# Altium PCB GNSS_PCB.PcbDoc
Units mm, origin at the board's own origin, x right, y up, seen from the top; angles counter-clockwise.
Board outline 80.13 x 49.05 mm, 2 copper layers (Top Layer, Bottom Layer), stack 1.571 mm thick; 81 components, 50 nets, 309 pads, 125 vias.
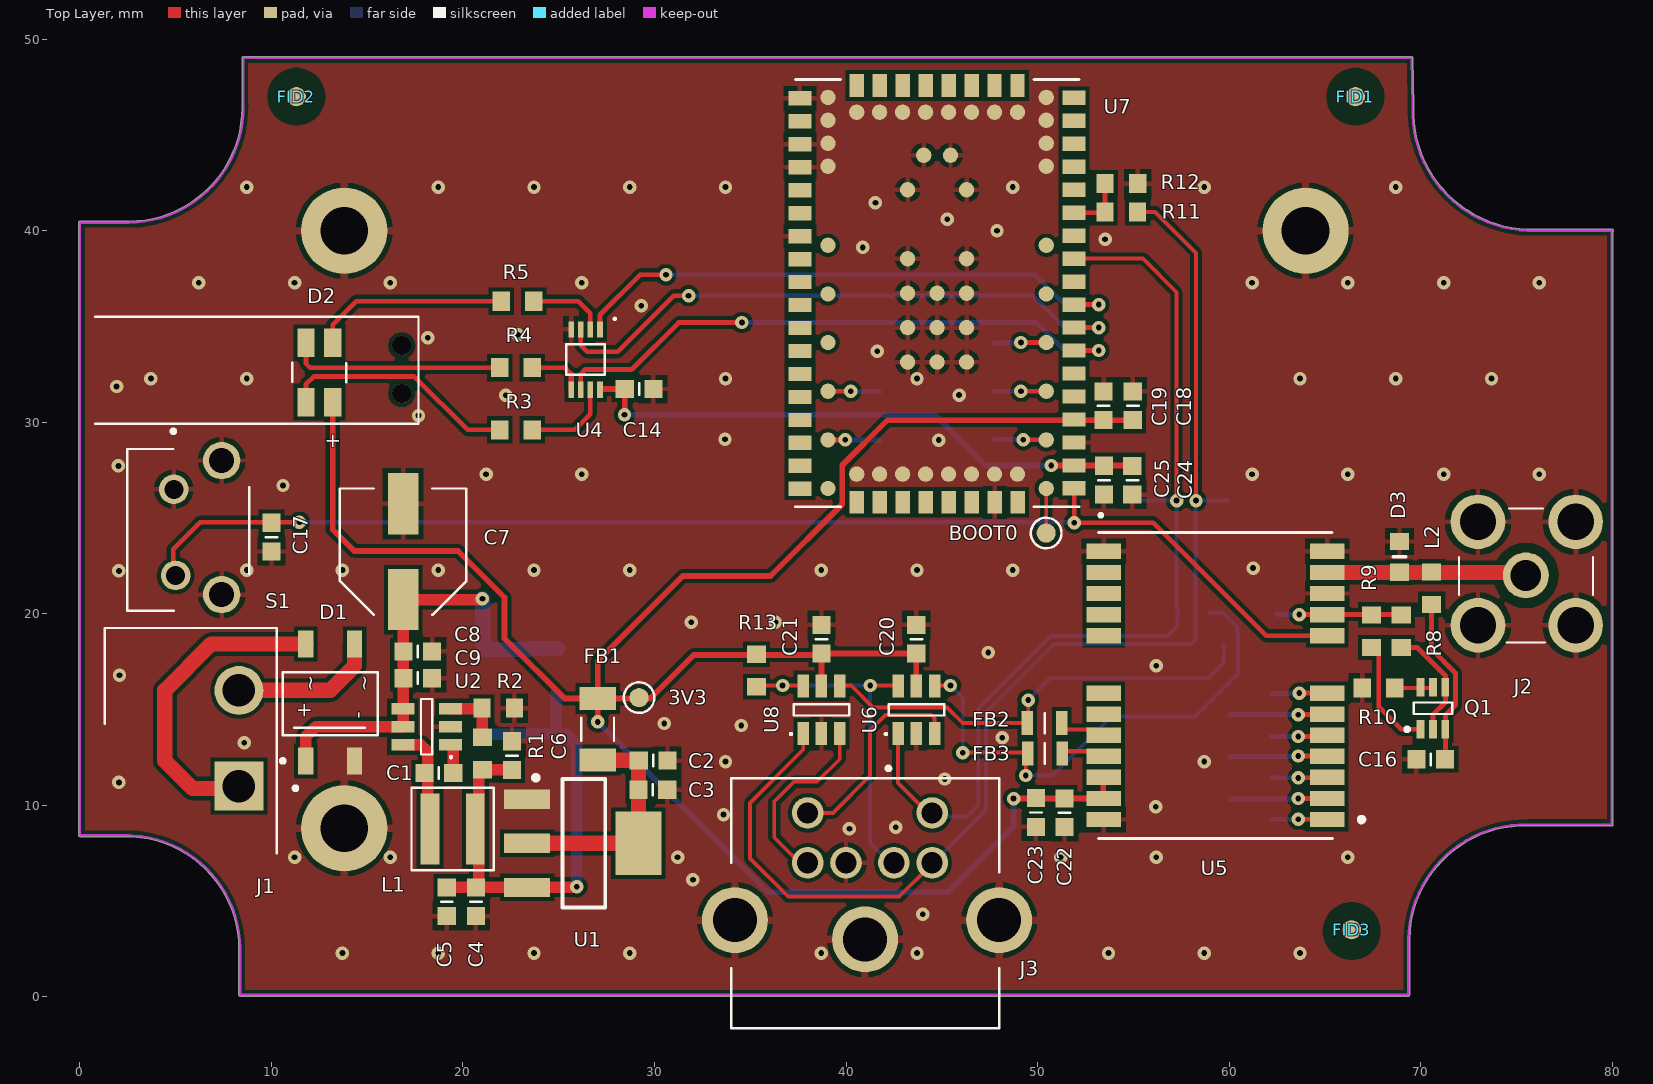
[diagram p0: Top Layer view]
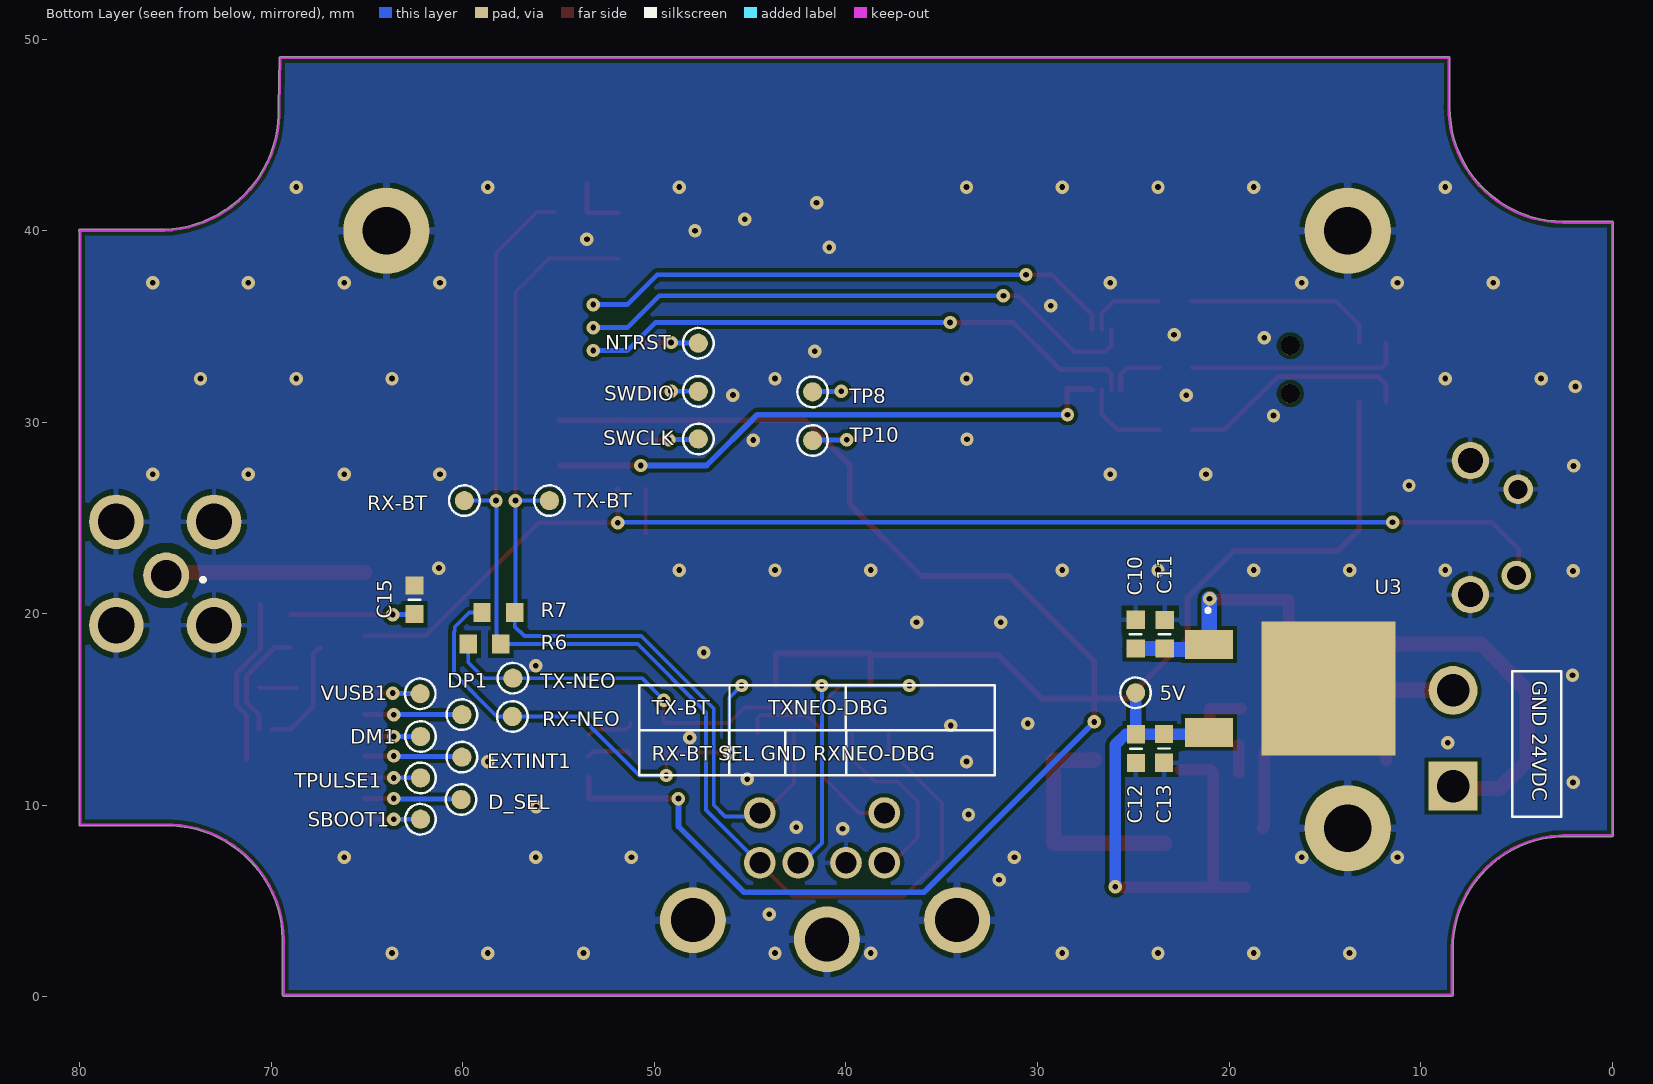
[diagram p1: Bottom Layer view, seen from below]
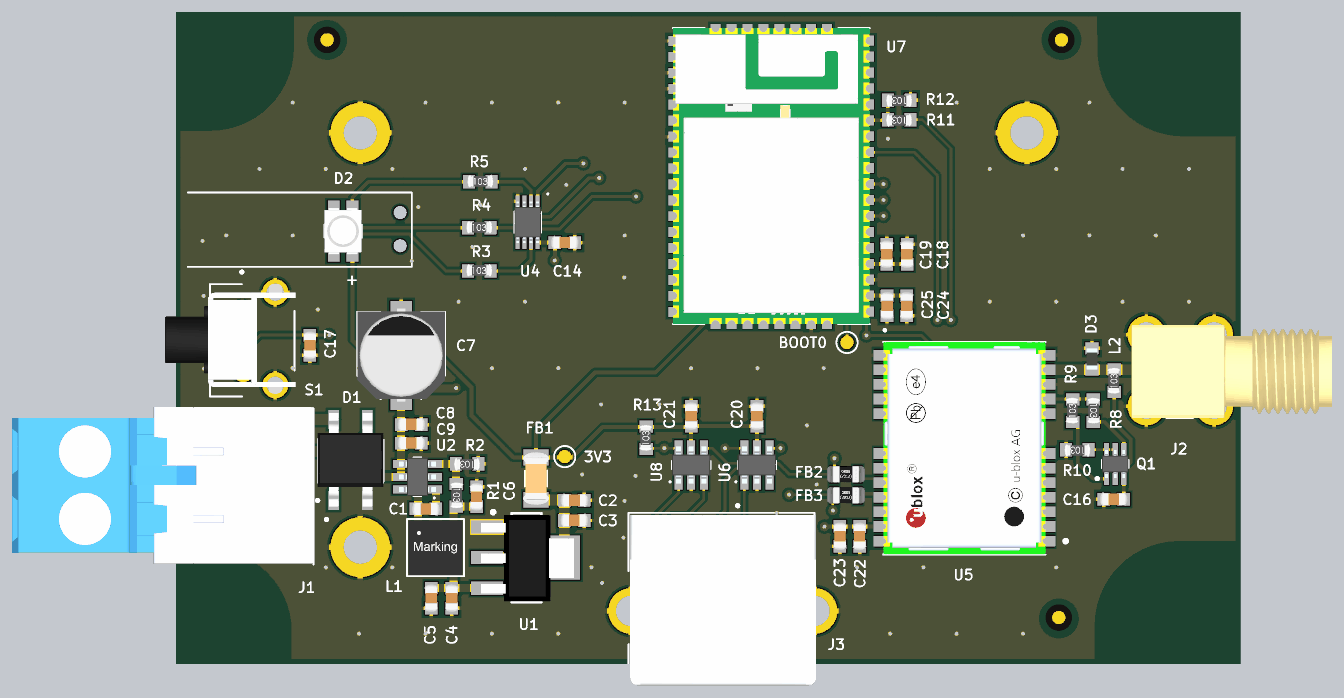
[diagram p2: 3D render of the assembled board from above, using the file's embedded part models]
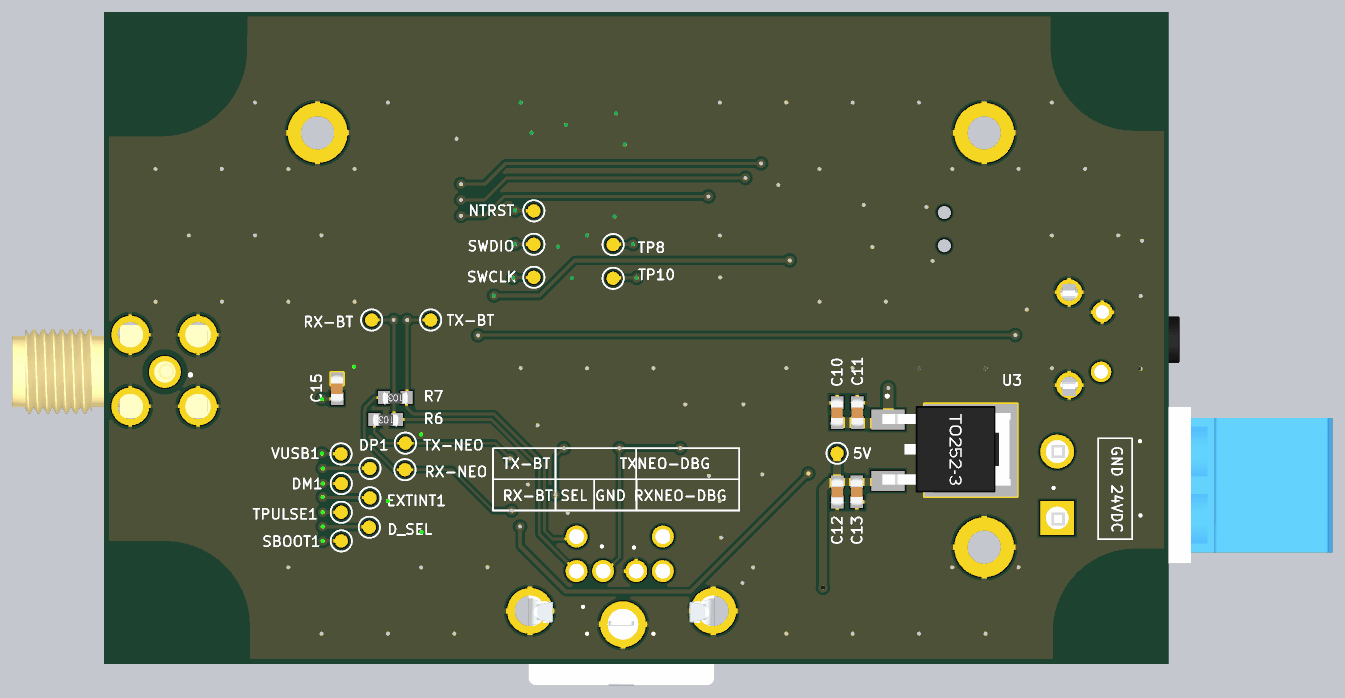
[diagram p3: 3D render of the assembled board from below, using the file's embedded part models]

## Layer stack, top to bottom
Top Solder: solder mask 0.0102, Solder Resist, Dk 3.5
Top Layer: signal copper 0.0356
Dielectric 1: dielectric 1.5, FR-4, Dk 4.8
Bottom Layer: signal copper 0.0356
Bottom Solder: solder mask 0.0102, Solder Resist, Dk 3.5

## Board outline
0,8.366 2.338,8.366 ccw(c2.343,8.43) 2.344,8.366 cw(c2.398,2.461) 8.303,2.515 ccw(c8.367,2.516) 8.303,2.51 8.303,0.1 ccw(c8.367,0.1) 8.367,0.036 69.367,0.036 ccw(c69.367,0.1) 69.431,0.1 69.431,2.999 cw(c75.47,2.892) 75.577,8.931 ccw(c75.578,8.995) 75.578,8.931 79.986,8.931 ccw(c79.986,8.995) 80.05,8.995 80.05,39.967 ccw(c80,40.007) 80.064,40.007 ccw(c80,40.007) 80,40.071 75.593,40.071 ccw(c75.821,46.243) 75.594,40.071 75.593,40.071 cw(c75.821,46.243) 69.648,46.47 ccw(c69.584,46.472) 69.648,46.472 ccw(c69.584,46.472) 69.648,46.474 69.595,49.023 cw(c69.531,49.022) 69.595,49.022 69.595,49.023 ccw(c69.531,49.022) 69.531,49.086 8.531,49.086 ccw(c8.531,49.022) 8.467,49.022 8.467,46.472 ccw(c8.531,46.472) 8.467,46.472 cw(c2.52,46.441) 8.468,46.441 cw(c2.52,46.441) 2.551,40.493 cw(c2.52,46.441) 2.551,40.493 0.012,40.493 ccw(c0,40.43) -0.064,40.43 -0.064,8.43 ccw(c0,8.43)

## Design rules (kind name [scope] priority, off if disabled: settings)
BoardOutlineClearance [NOT(IsTrack AND OnLayer('Top Overlay'))] p1: gap=0.254 ignorepadtopadclearanceinfootprint=FALSE
Clearance Clearance_2 [(InComponent('J2') AND InNet('NetD3_2') AND IsPad)] p1: gap=0.5 ignorepadtopadclearanceinfootprint=FALSE
Clearance [All] p2: gap=0.2 ignorepadtopadclearanceinfootprint=FALSE
HoleSize [All] p1: absolutevalues=TRUE maxlimit=10 minlimit=0.3 maxpercent=80.000 minpercent=20.000
MinimumSolderMaskSliver [All] p1: minsoldermaskwidth=0.09
PolygonConnect [All] p1: thpad.connectstyle=Relief thpad.reliefconductorwidth=0.254 thpad.reliefentries=4 thpad.polygonreliefangle="90 Angle" thpad.airgapwidth=0.3 smdpad.connectstyle=Direct smdpad.reliefconductorwidth=0.254 smdpad.reliefentries=4 smdpad.polygonreliefangle="90 Angle" smdpad.airgapwidth=0.254 via.connectstyle=Direct via.reliefconductorwidth=0.254 via.reliefentries=4 via.polygonreliefangle="90 Angle" via.airgapwidth=0.254
RoutingVias [All] p1: holewidth=0.3 width=0.7 viastyle="Through Hole" minholewidth=0.3 minwidth=0.7 maxholewidth=0.711 maxwidth=1.27
SilkToSolderMaskClearance [IsPad] p1: minsilkscreentomaskgap=0.2 clearancetoexposedcopper=TRUE
SolderMaskExpansion [All] p1: expansion=0.102 istentingtop=FALSE
Width [All] p1: maxlimit=2 minlimit=0.2 preferedwidth=0.254
27 further rules are at their usual default settings.

## Components (designator, comment, footprint, x,y, rotation, side; value= is the part's Value field where it differs from the comment)
3V3 "Test Point" TP 29.195,15.621 r90 top
5V "Test Point" TP 24.877,15.875 r180 bottom
BOOT0 "Test Point" TP 50.452,24.215 r90 top
C1 "C0603C104K5RAC3121" CAPC1608N 18.741,11.688 r0 top
C2 "C0603C104K5RAC3121" CAPC1608N 29.926,12.334 r0 top
C3 "GRM188R6YA106MA73D" CAPC1608N 29.914,10.81 r180 top
C4 "GRM188R6YA106MA73D" CAPC1608N 20.676,4.963 r90 top
C5 "C0603C104K5RAC3121" CAPC1608N 19.152,4.963 r270 top
C6 "GRM188R61A226ME15D" CAPC1608N 22.558,12.595 r270 top
C7 "EEEFK1V101XP" ECAP_SMD_6.3 16.876,23.241 r90 top
C8 "GRM188R6YA475KE5D" CAPC1608N 17.638,18.034 r180 top
C9 "C0603C104K5RAC3121" CAPC1608N 17.638,16.637 r180 top
C10 "GRM188R6YA106MA73D" CAPC1608N 24.872,18.935 r270 bottom
C11 "C0603C104K5RAC3121" CAPC1608N 23.359,18.929 r90 bottom
C12 "C0603C104K5RAC3121" CAPC1608N 24.861,12.957 r90 bottom
C13 "GRM188R6YA106MA73D" CAPC1608N 23.391,12.966 r270 bottom
C14 "C0603C104K5RAC3121" CAPC1608N 29.194,31.734 r180 top
C15 "GRT188R61H105KE13D" CAPC1608N 62.531,20.733 r270 bottom
C16 "C0603C104K5RAC3121" CAPC1608N 70.532,12.401 r180 top
C17 "C0603C104K5RAC3121" CAPC1608N 10,24 r90 top
C18 "C0603C104K5RAC3121" CAPC1608N 54.976,30.861 r270 top locked
C19 "GRT188R61H105KE13D" CAPC1608N 53.452,30.861 r270 top locked
C20 "C0603C104K5RAC3121" CAPC1608N 43.673,18.669 r270 top
C21 "C0603C104K5RAC3121" CAPC1608N 38.72,18.669 r270 top
C22 "C0603C104K5RAC3121" CAPC1608N 51.406,9.61 r270 top
C23 "GRM188R6YA106MA73D" CAPC1608N 49.916,9.623 r90 top
C24 "C0603C104K5RAC3121" CAPC1608N 54.95,26.972 r270 top locked
C25 "GRM188R6YA106MA73D" CAPC1608N 53.465,26.976 r90 top locked
D1 "MB6S" MB6S-2 13.066,15.367 r180 top
D2 "150141M173100" 150141M173100 12.5,32.6 r270 top
D3 "PESD0603-240" TVS1608 68.9,22.973 r270 top
D_SEL "Test Point" TP 60.1,10.3 r90 bottom
DM1 "Test Point" TP 62.215,13.589 r90 bottom
DP1 "Test Point" TP 60.056,14.732 r90 bottom
EXTINT1 "Test Point" TP 60.056,12.515 r90 bottom
FB1 "2512067007Y3" INDC3216N 27.036,13.97 r90 top
FB2 "BLM21BD102SZ1D" FB2012 50.369,14.289 r0 top
FB3 "BLM21BD102SZ1D" FB2012 50.38,12.703 r0 top
FID1 "Fiducial" FIDUCIAL-1MM#1 66.6,47 r0 top
FID2 "Fiducial" FIDUCIAL-1MM#1 11.3,47 r90 top
FID3 "Fiducial" FIDUCIAL-1MM#2 66.406,3.429 r90 top
J1 "TBP01R1-508-02BE" CUI_TBP01R1-508-02BE 8.3,13.4 r90 top locked
J2 "PCB.SMAFRA.HT" PCB.SMAFRA.HT 75.5,22 r180 top
J3 "KMDGX-6S-BS" KMDGX6SBS 42.3,7 r180 top locked
L1 "74438356150" IND4020 19.461,8.767 r0 top
L2 "L0603C27NJRMST" IND1608N 70.58,21.338 r90 top
NTRST "Test Point" TP 47.713,34.127 r180 bottom
Q1 "MBT3906DW1" SOT-363-6 70.648,15.067 r90 top
R1 "CR0603-FX-8872ELF" RESC1608N 21.027,12.704 r270 top
R2 "CRCW060322K1FKEA" RESC1608N 21.836,15.073 r180 top
R3 "ERJ-3GEYJ102V" RESC1608N 22.764,29.605 r0 top
R4 "ERJ-3GEYJ102V" RESC1608N 22.764,32.853 r0 top
R5 "RC0603JR-072K7L" RESC1608N 22.845,36.322 r0 top
R6 "MCT06030Z0000ZP500" RESC1608N 58.874,18.415 r0 bottom
R7 "MCT06030Z0000ZP500" RESC1608N 58.151,20.066 r0 bottom
R8 "CRCW060310R0FKEAC" RESC1608N 68.992,19.082 r270 top
R9 "CRCW0603240RFKEA" RESC1608N 67.449,19.088 r90 top
R10 "RC0603JR-072K2L" RESC1608N 67.805,16.132 r180 top
R11 "ERJ-3GEYJ102V" RESC1608N 54.374,40.984 r180 top
R12 "ERJ-3GEYJ102V" RESC1608N 54.381,42.463 r180 top locked
R13 "MCT06030C2004FP500" RESC1608N 35.328,17.034 r90 top
RX-BT "Test Point" TP 59.929,25.908 r90 bottom
RX-NEO "Test Point" TP 57.419,14.635 r90 bottom
S1 "1825027-8" 218250270 4.9,26.6 r270 top locked
SBOOT1 "Test Point" TP 62.215,9.271 r180 bottom
SWCLK "Test Point" TP 47.713,29.126 r180 bottom
SWDIO "Test Point" TP 47.713,31.61 r180 bottom
TP8 "Test Point" TP 41.744,31.587 r180 bottom
TP10 "Test Point" TP 41.744,29.047 r180 bottom
TPULSE1 "Test Point" TP 62.215,11.43 r90 bottom
TX-BT "Test Point" TP 55.484,25.908 r90 bottom
TX-NEO "Test Point" TP 57.389,16.637 r90 bottom
U1 "TLV1117" SOT223-2 26.253,8.015 r0 top
U2 "LMR50410" SOT-23-6 18.106,14.101 r180 top
U3 "BD50C0AFP" TO-252-3-2 17.925,16.1 r270 bottom
U4 "SN74LVC3G07" VSSOP-8 26.401,33.274 r270 top
U5 "NEO-M8N-0" NEO-M8N 59.294,16.256 r0 top locked
U6 "SN74LVC1G3157" SOT-23-6 43.673,14.986 r90 top
U7 "ODIN-W262-05" ODIN-W26 44.757,36.741 r180 top locked
U8 "SN74LVC1G3157" SOT-23-6 38.72,14.986 r90 top
VUSB1 "Test Point" TP 62.233,15.824 r90 bottom

## Footprints (in the part's own frame and the unit in brackets; to place one, negate y for a bottom-side part, rotate by r counter-clockwise, add the part's x,y. Pads: shape width x height; smd on the part's side, far side on the other; paste and mask are expansions set on the pad)
150141M173100 [mm]
  rect 1.5x0.9 smd: 1(1.55,0.7) 2(1.55,-0.7) 3(-1.55,0.7) 4(-1.55,-0.7)
  silkscreen extent -0.51,-1.41 0.51,1.4, body extent -1.75,-1.4 1.75,1.4, height 1.9
218250270 [mm]
  round 1.54 hole 0.99: 1(0.1,0) 2(4.6,0.1)
  round 1.95 hole 1.3: MH(-1.4,2.5) MH(5.6,2.5)
  silkscreen extent -3.02,-2.42 6.45,3.94, body extent -2.01,-5.82 6.4,4.02, height 7
CAPC1608N [mm]
  rrect0% 0.95x0.95 smd: 1(-0.75,0) 2(0.75,0)
  silkscreen extent 0,-0.3 0,0.3, body extent -1.05,-0.53 1.05,0.5, height 0.81
CUI_TBP01R1-508-02BE [mm]
  rect 2.55x2.55 hole 1.7: 1(-2.4,0)
  round 2.55 hole 1.7: 2(2.6,0)
  silkscreen extent -5.9,-3.05 5.86,7, body extent -5.81,-1.93 5.95,20.73, height 15.08
ECAP_SMD_6.3 [mm]
  rect 3.2x1.6 smd: 1(-2.5,0) 2(2.5,0)
  silkscreen extent -3.3,-3.3 3.3,3.3, body extent -3.48,-3.3 3.52,3.3, height 3.91
FB2012 [mm]
  rect 0.6x1.25 smd: 1(-0.9,0) 2(0.9,0)
  silkscreen extent 0,-0.52 0,0.53, body extent -1.4,-0.62 1.4,0.63, height 0.8
FIDUCIAL-1MM#1 [mm] "1MM FIDUCAL MARKER"
  round 1 smd paste-1 mask+0.5: F1(0,0)
  Top Layer pour cut-out: -1.5,0 -1.386,-0.574 -1.061,-1.061 -0.574,-1.386 0,-1.5 0,-1.5 0.574,-1.386 1.061,-1.061 1.386,-0.574 1.5,0 1.5,0 1.386,0.574 1.061,1.061 0.574,1.386 0,1.5 0,1.5 -0.574,1.386 -1.061,1.061 -1.386,0.574 -1.5,0
FIDUCIAL-1MM#2 [mm] "1MM FIDUCAL MARKER"
  round 1 smd paste-1 mask+0.5: F1(0.071,0.006)
  Top Layer pour cut-out: -1.5,0 -1.386,-0.574 -1.061,-1.061 -0.574,-1.386 0,-1.5 0,-1.5 0.574,-1.386 1.061,-1.061 1.386,-0.574 1.5,0 1.5,0 1.386,0.574 1.061,1.061 0.574,1.386 0,1.5 0,1.5 -0.574,1.386 -1.061,1.061 -1.386,0.574 -1.5,0
IND1608N [mm] "Chip Resistor, Body 1.6x0.8mm, IPC Medium Density"
  rect 0.9x1 smd: 1(-0.85,0) 2(0.85,0)
  body extent -0.99,-0.45 0.99,0.53, height 0.43
IND4020 [mm] "SMT Shielded Power Inductor, body 4.1x4.1mm"
  rect 0.98x3.7 smd: 1(-1.185,0) 2(1.185,0)
  silkscreen extent -2.15,-2.15 2.15,2.15, body extent -2.05,-2.05 2.05,2.05, height 2.1
INDC3216N [mm] "Chip Inductor, Body 3.2x1.6mm, IPC Medium Density"
  rect 1.2x1.9 smd: 1(-1.6,0) 2(1.6,0)
  silkscreen extent -0.6,-0.85 0.6,0.85, body extent -1.97,-0.98 1.97,0.98, height 1.3
KMDGX6SBS [mm]
  round 1.65 hole 1.1: 1(-0.2,0) 2(2.3,0) 3(-2.2,0) 4(4.3,0) 5(-2.2,-2.6) 6(4.3,-2.6)
  round 3.45 hole 2.3: MH(-5.7,3) MH(1.3,4) MH(8.1,3)
  silkscreen extent -5.7,-5.03 8.3,8.65, body extent -5.82,-4.23 8.18,8.6, height 13
MB6S-2 [mm]
  rect 0.8x1.4 smd mask+0: 1(1.27,3.05) 2(-1.27,-3.05) 3(-1.27,3.05) 4(1.27,-3.05)
  silkscreen extent -2.48,-1.58 2.57,3.15, body extent -2.48,-3.52 2.47,3.52, height 2.7
NEO-M8N [mm]
  rect 1.8x0.8 smd paste-0.1: 1(5.842,-7) 2(5.842,-5.9) 3(5.842,-4.8) 4(5.842,-3.7) 5(5.842,-2.6) 6(5.842,-1.5) 7(5.842,-0.4) 8(5.842,2.6) 9(5.842,3.7) 10(5.842,4.8) 11(5.842,5.9) 12(5.842,7) 13(-5.842,7) 14(-5.842,5.9) 15(-5.842,4.8) 16(-5.842,3.7) 17(-5.842,2.6) 18(-5.842,-0.4) 19(-5.842,-1.5) 20(-5.842,-2.6) 21(-5.842,-3.7) 22(-5.842,-4.8) 23(-5.842,-5.9) 24(-5.842,-7)
  silkscreen extent -6.11,-8 7.68,8, body extent -6.1,-8 6.1,8, height 2.28
ODIN-W26 [mm] "ODIN-W262 WiFi/BT  module"
  rect 1.19x0.75 smd mask+0.05: A1(-7.147,10.196) A2(-7.147,8.996) A3(-7.147,7.796) A4(-7.147,6.596) A5(-7.147,5.396) A6(-7.147,4.196) A7(-7.147,2.996) A8(-7.147,1.796) A9(-7.147,0.596) A10(-7.147,-0.604) A11(-7.147,-1.804) A12(-7.147,-3.004) A13(-7.147,-4.204) A14(-7.147,-5.404) A15(-7.147,-6.604) A16(-7.147,-7.804) A17(-7.147,-9.004) A18(-7.147,-10.204) C1(7.165,-10.18) C2(7.165,-8.98) C3(7.165,-7.78) C4(7.165,-6.58) C5(7.165,-5.38) C6(7.165,-4.18) C7(7.165,-2.98) C8(7.165,-1.78) C9(7.165,-0.58) C10(7.165,0.62) C11(7.165,1.82) C12(7.165,3.02) C13(7.165,4.22) C14(7.165,5.42) C15(7.165,6.62) C16(7.165,7.82) C17(7.165,9.02) C18(7.165,10.22)
  rect 0.75x1.19 smd mask+0.05: B1(-4.2,-10.85) B2(-3,-10.85) B3(-1.8,-10.85) B4(-0.6,-10.85) B5(0.6,-10.85) B6(1.8,-10.85) B7(3,-10.85) B8(4.2,-10.85) D1(4.198,10.919) D2(2.998,10.919) D3(1.798,10.919) D4(0.598,10.919) D5(-0.602,10.919) D6(-1.802,10.919) D7(-3.002,10.919) D8(-4.202,10.919)
  round 0.8 smd mask+0.05: GND(-5.7,-7.825) GND(-5.7,-6.625) GND(-5.7,-10.225) GND(-5.7,-9.025) GND(-4.2,9.45) GND(-4.2,-9.45) GND(-3,9.45) GND(-3,-9.45) GND(-1.8,9.45) GND(-1.8,-9.45) GND(-1.54,3.6) GND(-1.54,1.8) GND(-1.54,0) GND(-1.54,-1.8) GND(-1.54,-5.4) GND(-0.7,-7.2) GND(-0.6,9.45) GND(-0.6,-9.45) GND(0,3.6) GND(0,1.8) GND(0,0) GND(0.6,9.45) GND(0.6,-9.45) GND(0.7,-7.2) GND(1.54,3.6) GND(1.54,1.8) GND(1.54,0) GND(1.54,-1.8) GND(1.54,-5.4) GND(1.8,9.45) GND(1.8,-9.45) GND(3,9.45) GND(3,-9.45) GND(4.2,9.45) GND(4.2,-9.45) GND(5.7,-7.825) GND(5.7,-6.625) GND(5.7,-10.225) GND(5.7,-9.025) TP1(-5.7,-2.5) TP2(5.7,-2.5) TP3(-5.7,0.04) TP4(5.7,0.04) TP5(-5.7,2.58) TP6(5.7,2.58) TP7(-5.7,5.12) TP8(5.7,5.12) TP9(-5.7,7.66) TP10(5.7,7.66) TP11(-5.7,10.2) TP12(5.7,10.2)
  silkscreen extent -8.62,-11.15 7.4,11.67, body extent -7.4,-11.15 7.4,11.15, height 4.47
PCB.SMAFRA.HT [mm]
  round 2.4 hole 1.6: 1(0,0)
  round 2.85 hole 1.9: 2(-2.6,-2.8) 3(2.5,-2.8) 4(2.5,2.6) 5(-2.6,2.6)
  silkscreen extent -3.5,-3.5 3.5,3.5, body extent -11.48,-3.54 3.62,3.46, height 8.42
RESC1608N [mm] "Chip Resistor, Body 1.6x0.8mm, IPC Medium Density"
  rect 0.9x1 smd: 1(-0.85,0) 2(0.85,0)
  body extent -0.99,-0.45 0.99,0.53, height 0.43
SOT223-2 [mm]
  rect 2.4x1 smd: 1(-2.9,2.3) 2(-2.9,0) 3(-2.9,-2.3)
  rect 2.4x3.3 smd: 2(2.9,0)
  silkscreen extent -2.57,-3.35 1.17,3.55, body extent -3.37,-3.3 3.63,3.2, height 1.86
SOT-23-6 [mm]
  rect 1.2x0.6 smd: 1(-1.25,0.95) 2(-1.25,0) 3(-1.25,-0.95) 4(1.25,-0.95) 5(1.25,0) 6(1.25,0.95)
  silkscreen extent -1.31,-1.45 0.3,1.64, body extent -1.4,-1.45 1.4,1.45, height 1.45
SOT-363-6 [mm]
  rect 0.95x0.4 smd mask+0.07: 1(-1.1,0.65) 2(-1.1,0) 3(-1.1,-0.65) 4(1.1,-0.65) 5(1.1,0) 6(1.1,0.65)
  silkscreen extent -1.2,-1 0.3,1.45, body extent -1.05,-1 1.05,1, height 1.1
TO-252-3-2 [mm]
  rect 1.5x2.5 smd: 1(-2.3,-3.125) 2(2.3,-3.125)
  rect 7x7 smd: 3(0,3.125)
  silkscreen extent -4.17,-3.27 -3.98,-3.08, body extent -3.35,-3.55 3.19,6.12, height 2.29
TP [mm]
  round 1 smd paste-2 mask+0.1: 1(0,0)
  silkscreen extent -0.8,-0.8 0.8,0.8
TVS1608 [mm]
  rect 0.9x1 smd: 1(-0.8,0) 2(0.8,0)
  silkscreen extent 0,-0.31 0,0.31, body extent -0.8,-0.41 0.8,0.41, height 0.55
VSSOP-8 [mm]
  rect 0.85x0.3 smd: 1(-1.575,0.75) 2(-1.575,0.25) 3(-1.575,-0.25) 4(-1.575,-0.75) 5(1.575,-0.75) 6(1.575,-0.25) 7(1.575,0.25) 8(1.575,0.75)
  silkscreen extent -2.17,-1 0.8,1.58, body extent -1.55,-1 1.55,1, height 0.9

## Part data
3V3 5V BOOT0 D_SEL DM1 DP1 EXTINT1 NTRST RX-BT RX-NEO SBOOT1 SWCLK SWDIO TP8 TP10 TPULSE1 TX-BT TX-NEO VUSB1: library part MIS-000000003, Part Number=MIS-000000001, Value 1=_, DES=_, FTP=_, MAN=_, MANREF=_, NOTE=_, SUP=_, SUPREF=_, TOL=_, Value 2=_
C1 C2 C5 C9 C11 C12 C14 C16 C17 C18 C20 C21 C22 C24: library part CAP-000000052, Part Number=CAP-000000001, Value 1=100nF, Value 2=50V, DES="Condensateurs cÃ©ramique multicouches MLCC - CMS 50V .1uF X7R 0603 10% AEC-Q200", FTP=0603, MAN=KEMET, MANREF=C0603C104K5RAC3121, NOTE=_, SUP=Mouser, SUPREF=80-C603C104K5RAC3121, TOL=10%
C3 C4 C10 C13 C23 C25: library part CAP-000000051, Part Number=CAP-000000003, Value 1=10uF, Value 2=35V, DES="Multilayer Ceramic Capacitors MLCC - SMD/SMT 0603 10uF 35volts *Derate Voltage/Temp", FTP=0603, MAN="Murata Electronics", MANREF=GRM188R6YA106MA73D, NOTE=_, SUP=Mouser, SUPREF=81-GRM188R6YA106MA3D, TOL=20%
C6: library part CAP-000000055, Part Number=CAP-000000006, Value 1=22uF, Value 2=10V, DES="Multilayer Ceramic Capacitors MLCC - SMD/SMT 0603 22uF 10volts *Derate Voltage/Temp", FTP=0603, MAN="Murata Electronics", MANREF=GRM188R61A226ME15D, NOTE=_, SUP=Mouser, SUPREF=81-GRM188R61A226ME5D, TOL=20%
C7: library part CAP-000000048, Part Number=CAP-000000001, Value 1=100uF, Value 2=35V, DES="PANASONIC ELECTRONIC COMPONENTS  EEEFK1V101XP  CONDENSATEUR ELEC ALU 100UF 35V CMS", FTP="SMD Size D8", MAN=PANASONIC, MANREF=EEEFK1V101XP, NOTE=_, SUP=Mouser, SUPREF="667-EEE-FK1V101XP /  / V101XP", TOL=20%
C8: library part CAP-000000054, Part Number=CAP-000000005, Value 1=4.7uF, Value 2=35V, DES="Multilayer Ceramic Capacitors MLCC - SMD/SMT 4.7UF 16V 10% 0603", FTP=0603, MAN="Murata Electronics", MANREF=GRM188R6YA475KE5D, NOTE=_, SUP=Mouser, SUPREF=81-GRM188R6YA475KE5D, TOL=10%
C15 C19: library part CAP-000000053, Part Number=CAP-000000004, Value 1=1uF, Value 2=50V, DES="Condensateurs cÃ©ramique multicouches MLCC - CMS 0603 50Vdc 1.0uF X5R 10%", FTP=0603, MAN="Murata Electronics", MANREF=GRT188R61H105KE13D, NOTE=_, SUP=Mouser, SUPREF=81-GRT188R61H105KE3D, TOL=10%
D1: library part DIB-000000002, Part Number=DIB-000000001, Value 1=0.5A, Value 2=600V, DES="Redresseurs en pont .5A 600V", FTP=MBS-1, MAN="Micro Commercial Components (MCC)", MANREF=MB6S-TP, NOTE=_, SUP=Mouser, SUPREF=833-MB6S-TP, TOL=_
D2: library part LED-000000004, Part Number=LED-000000001, Value 1="20 mA", Value 2="2 V, 3.2 V, 3.2 V", DES="WL-SFTW SMD Full-color TOP LED Waterclear, size 5050, Red & Green & Blue, 120deg", FTP="1411 (3528 metric)", MAN="Wurth Elektronik", MANREF=150141M173100, NOTE=_, SUP=Mouser, SUPREF=710-150141M173100, TOL=_
D3: library part TVS-000000003, Part Number=TVS-000000001, Value 1="24 V", Value 2=0.25pF, DES="ESD Suppressors / TVS Diodes 0.25pFA 24V 0603 AEC-Q200", FTP=0603, MAN=Littelfuse, MANREF=PESD0603-240, NOTE=_, SUP=Mouser, SUPREF=650-PESD0603-240, TOL=_
FB1: library part FER-000000001, Value 1=70Ohm, Value 2=0R04, DES="2512067007Y3 -  Perle de ferrite, 1206 [3216 Metric], 70 ohm, 3 A, 0.04 ohm, Â± 25%", FTP=1206, MAN=FAIR-RITE, MANREF=2512067007Y3, NOTE=_, Part Number=FER-000000001, SUP=Mouser, SUPREF=623-2512067007Y3, TOL=25%
FB2 FB3: library part FER-000000002, Value 1=1K, Value 2=250mA, DES="Ferrite Beads 0805 1000ohms 250mA Auto Infotainment", FTP=0805, MAN="Murata Electronics", MANREF=BLM21BD102SZ1D, NOTE=_, Part Number=FER-000000002, SUP=Mouser, SUPREF=81-BLM21BD102SZ1D, TOL=25%
FID1 FID2 FID3: library part MIS-000000004, Part Number=MIS-000000002, Value 1=1mm, Value 2=_, DES=_, FTP=_, MAN=_, MANREF=_, NOTE=_, SUP=_, SUPREF=_, TOL=_
J1: library part CON-000000043, Part Number=CON-000000001, Value 1=2pts, Value 2="5.08 mm", DES="Pluggable Terminal Blocks Terminal block, pluggable, 5.08, receptical, 2 pole, blue", FTP=THT, MAN="CUI Devices", MANREF="TBP01R1-508-02BE /  /  /  / 39910-0102", NOTE=_, SUP=Mouser, SUPREF=490-TBP01R1-508-02BE, TOL=_
J2: library part CON-000000042, Part Number=CON-000000003, Value 1=5pts, Value 2=_, DES="Connecteurs RF / Connecteurs coaxiaux SMA RA PCB Mount, Jack, Gold, 50 , Through Hole Pin", FTP=THT, MAN=Taoglas, MANREF=PCB.SMAFRA.HT, NOTE=_, SUP=Mouser, SUPREF=960-PCB.SMAFRA.HT, TOL=_
J3: library part CON-000000041, Part Number=CON-000000002, Value 1=6pts, Value 2=_, DES="Circular DIN Connectors 6P R/A FULL SHIELD GOLD PLANTED", FTP=THT, MAN=Kycon, MANREF=KMDGX-6S-BS, NOTE=_, SUP=Mouser, SUPREF=806-KMDGX-6S-BS, TOL=_
L1: library part IND-000000003, Part Number=IND-000000001, Value 1="15 uH", Value 2="1.9 A", DES="Fixed Inductors WE-MAPI 15uH 1.9A DCR=230mOhms AECQ200", FTP=4020, MAN="Wurth Elektronik", MANREF=74438356150, NOTE=_, SUP=Mouser, SUPREF=710-74438356150, TOL=20%
L2: library part IND-000000002, Value 1=27nH, Value 2="0,3 A", DES="Fixed Inductors 27nH 300mA 5%", FTP=0603, MAN=KEMET, MANREF=L0603C27NJRMST, NOTE=_, Part Number=IND-000000002, SUP=Mouser, SUPREF=80-L0603C27NJRMST, TOL="5 %"
Q1: library part TRP-000000009, Part Number=TRP-000000001, Value 1="- 40 V", Value 2="0.2 A", DES="Bipolar Transistors - BJT SS GP XSTR PNP 40V", FTP=SOT-363-6, MAN="ON Semiconductor", MANREF=MBT3906DW1T1G, NOTE=_, SUP=Mouser, SUPREF=863-MBT3906DW1T1G, TOL=_
R1: library part RES-000000120, Part Number=RES-000000007, Value 1=88.7K, Value 2=0.1W, DES="RÃ©sistances Ã  couches Ã©paisses - CMS 88.7K ohm 1%", FTP=0603, MAN=Bourns, MANREF=CR0603-FX-8872ELF, NOTE=_, SUP=Mouser, SUPREF=652-CR0603FX-8872ELF, TOL=1%
R2: library part RES-000000119, Part Number=RES-000000006, Value 1=22.1k, Value 2=0.1W, DES="RÃ©sistances Ã  couches Ã©paisses - CMS 1/10watt 22.1Kohms 1%", FTP=0603, MAN="Vishay / Dale", MANREF=CRCW060322K1FKEA, NOTE=_, SUP=Mouser, SUPREF=71-CRCW0603-22.1K-E3, TOL=1%
R3 R4 R11 R12: library part RES-000000115, Part Number=RES-000000001, Value 1=1K, Value 2=0.1W, DES="RÃ©sistances Ã  couches Ã©paisses - CMS 0603 1Kohms 5% AEC-Q200", FTP=0603, MAN=Panasonic, MANREF=ERJ-3GEYJ102V, NOTE=_, SUP=Mouser, SUPREF=667-ERJ-3GEYJ102V, TOL=1%
R5: library part RES-000000122, Part Number=RES-000000009, Value 1=2K7, Value 2=0.1W, DES="RÃ©sistances Ã  couches Ã©paisses - CMS 2.7K OHM 5%", FTP=0603, MAN=YAGEO, MANREF=RC0603JR-072K7L, NOTE=_, SUP=Mouser, SUPREF=603-RC0603JR-072K7L, TOL=5%
R6 R7: library part RES-000000103, Part Number=RES-000000004, Value 1=0R, Value 2=0.125W, DES="Thin Film Resistors - SMD Zero ohm Jumper", FTP=0603, MAN="Vishay / Beyschlag", MANREF=MCT06030Z0000ZP500, NOTE=_, SUP=Mouser, SUPREF=594-MCT06030Z0000ZP5, TOL=_
R8: library part RES-000000116, Part Number=RES-000000002, Value 1=10R, Value 2=0.1W, DES="RÃ©sistances Ã  couches Ã©paisses - CMS 1/10Watt 10ohms 1% Commercial Use", FTP=0603, MAN="Vishay / Dale", MANREF=CRCW060310R0FKEAC, NOTE=_, SUP=Mouser, SUPREF=71-CRCW060310R0FKEAC, TOL=1%
R9: library part RES-000000118, Part Number=RES-000000005, Value 1=240R, Value 2=0.1W, DES="RÃ©sistances Ã  couches Ã©paisses - CMS 1/10watt 240ohms 1%", FTP=0603, MAN="Vishay / Dale", MANREF=CRCW0603240RFKEA, NOTE=_, SUP=Mouser, SUPREF=71-CRCW0603-240-E3, TOL=1%
R10: library part RES-000000117, Part Number=RES-000000003, Value 1=2K2, Value 2=0.1W, DES="RÃ©sistances Ã  couches Ã©paisses - CMS 2.2K OHM 5%", FTP=0603, MAN=YAGEO, MANREF=RC0603JR-072K2L, NOTE=_, SUP=Mouser, SUPREF=603-RC0603JR-072K2L, TOL=5%
R13: library part RES-000000121, Part Number=RES-000000008, Value 1="2 M", Value 2=0.125W, DES="Thin Film Resistors .1W 2Mohms 1% 0603 50ppm", FTP=0603, MAN="Vishay / Beyschlag", MANREF=MCT06030C2004FP500, NOTE=_, SUP=Mouser, SUPREF=594-MCT06030C2004FP5, TOL=1%
S1: library part SWC-000000001, Value 1=_, DES="Tactile Switches R/A TACT 160G PB SWITCH", FTP=THT, MAN="TE Connectivity / P&B", MANREF=1825027-8, NOTE=_, Part Number=SWC-000000001, SUP=Mouser, SUPREF=506-1825027-8, TOL=_, Value 2=_
U1: library part VRG-000000002, Part Number=VRG-000000001, Value 1=3.3V, Value 2=1A, DES="TEXAS INSTRUMENTS  TLV1117LV33DCYR  LDO FIXE 3.3V 1A SOT-223-4", FTP=SOT-223, MAN="Texas Instrument", MANREF=TLV1117LV33DCYR, NOTE=_, SUP=Mouser, SUPREF=595-TLV1117LV33DCYR, TOL=_
U2: library part ICP-000000001, Value 1="36 V", Value 2="1 A", DES="Switching Voltage Regulators Automotive qualified SIMPLE SWITCHER 4-V to 36-V, 1-A synchronous step-down converter 6-SOT-23 -40 to 150", FTP=SOT-23-6, MAN="Texas Instruments", MANREF=LMR50410YQDBVRQ1, NOTE=_, Part Number=ICP-000000001, SUP=Mouser, SUPREF=595-LMR50410YQDBVRQ1, TOL=_
U3: library part VRG-000000019, Part Number=VRG-000000003, Value 1=5V, Value 2=1A, DES="LDO Voltage Regulators 4-26.5V TO252-3 15A LDO Regulator", FTP=TO-252-3, MAN="ROHM Semiconductor", MANREF=BD50C0AFP-CE2, NOTE=_, SUP=Mouser, SUPREF=755-BD50C0AFP-CE2, TOL=_
U4: library part ICD-000000001, Value 1="5.5 V", Value 2=_, DES="Buffers & Line Drivers Triple w/ OD", FTP=VSSOP-8, MAN="TEXAS INSTRUMENTS", MANREF=SN74LVC3G07DCUR, NOTE=_, Part Number=ICD-000000001, SUP=Mouser, SUPREF=595-SN74LVC3G07DCUR, TOL=_
U5: library part RFC-000000004, Part Number=RFC-000000001, Value 1=_, DES="NEO-M8 RF Receiver BeiDou, Galileo, GLONASS, GNSS, GPS 1.575GHz -167dBm", FTP=_, MAN=U-Blox, MANREF=NEO-M8N-0, NOTE=_, SUP=Digi-Key, SUPREF=672-NEO-M8N-0TR-ND, TOL=_, Value 2=_
U6 U8: library part GIC-000000002, Part Number=GIC-000000001, Value 1="5.5 V", Value 2=_, DES="Analogue Switch ICs SPDT Analog Switchc", FTP=SOT-23-6, MAN="Texas Instruments", MANREF=SN74LVC1G3157DBVR, NOTE=_, SUP=Mouser, SUPREF=595-SN74LVC1G3157DBV, TOL=_
U7: library part RFC-000000005, Part Number=RFC-000000002, Value 1=_, DES="RX TXRX MODULE WIFI CHIP SMD", FTP=_, MAN=U-Blox, MANREF=ODIN-W262-05B, NOTE=_, SUP=Digi-Key, SUPREF=672-ODIN-W262-05BTR-ND, TOL=_, Value 2=_

## Free pads (board coordinates)
  round 4.5 hole 2.5: 1(13.8,8.8) 1(13.8,40) 1(64,40)
  round 1 hole 1 unplated: 1(16.8,31.5) 1(16.8,34)

## Via types
v1: diameter 0.7, hole 0.3, Top Layer to Bottom Layer, tented both sides, 125 vias

## Nets (pads, with @x,y where several pads share a name; then routed paths per layer and width w, separated by ;. In a path a pad name is that pad's centre, name@x,y a point inside that pad or via, vN(x,y) a via of type N, cw(c..) or ccw(c..) an arc to the next point about the centre after c; other vN are vias at no path point)
1V8: C14.2 C24.1 C25.2 U4.8 U7.A2 | length 30.6
  Top Layer w0.3: U4.8 27.186,31.734 C14.2 v1@28.444,30.215 ; v1@28.436,30.223 v1(28.436,30.395) ; v1(50.711,27.743) 54.929,27.743 C24.1
  Bottom Layer w0.3: v1(28.436,30.395) 44.633,30.395 47.286,27.743 v1(50.711,27.743)
3.3V: 3V3.1 C18.2 C19.2 C20.2 C21.2 C22.1 C23.2 D2.1 FB1.2 R13.2 U5.22 U5.23 U6.5 U7.A4 U8.5 | length 117.9
  Top Layer w0.3: D2.1 13.2,27.7 13.2,25.741 13.2,24.393 14.318,23.275 19.746,23.275 22.164,20.856 22.164,18.715 25.309,15.57 FB1.2 ; v1(27.036,14.351) FB1.2 ; U8.5 C21.2 ; U6.5 C20.2 C21.2 ; v1(48.752,10.348) C23.2@49.892,10.348 ; C23.2@49.937,10.352 53.436,10.352 U5.22@53.436,11.452 ; U7.A4@51.904,30.111 C19.2 C18.2 ; U7.A4 51.87,30.111 42.161,30.111 39.807,27.757 39.807,25.719 36.059,21.971 31.481,21.971 27.036,17.526 FB1.2 ; FB1.2 29.195,15.57 29.779,15.57 32.052,17.844 35.328,17.844 38.644,17.844 C21.2
  Bottom Layer w0.3: v1(27.036,14.351) 35.926,5.461 45.324,5.461 48.752,8.889 v1(48.752,10.348)
5V: 5V.1 C4.2 C5.1 C6.2 C12.2 C13.1 L1.2 R1.2 U1.3 U3.2 | length 29.3
  Top Layer w0.6: C5.1 19.167,5.728 C4.2@20.83,5.728 ; C6.2 22.554,11.849 21.031,11.849 R1.2 20.98,11.854 20.83,11.704 C4.2@20.83,5.728 ; v1(25.945,5.743) 25.93,5.728 C4.2@20.83,5.728
  Bottom Layer w0.6: U3.2@21.017,13.702 21.032,13.717 C12.2@24.823,13.717 ; C12.2 24.869,13.715 24.869,15.867 5V.1 ; C12.2@24.87,13.716 25.385,13.716 25.945,13.156 v1(25.945,5.743)
24V: C7.1 C8.2 C9.2 C10.2 C11.1 D1.1 U2.4 U2.5 U3.1 | length 23.9
  Top Layer w0.6: D1.1 11.796,13.589 12.307,14.101 U2.5 16.876,14.101 C7.1 20.964,20.741 v1(21.013,20.79)
  Bottom Layer w0.8: v1(21.013,20.79) 21.024,20.778 21.024,18.309 21.017,18.302 21.18,18.139 23.43,18.139 23.476,18.185 C10.2@24.954,18.185
BLED: U4.1 U7.A9 | length 29.6
  Top Layer w0.25: U4.1 27.151,35.601 29.25,37.7 v1(30.6,37.7) ; U7.A9 v1(53.198,36.145)
  Bottom Layer w0.25: v1(30.6,37.7) 49.865,37.7 51.42,36.145 v1(53.198,36.145)
GLED: U4.3 U7.A8 | length 31.2
  Top Layer w0.25: U4.3 26.151,34.032 26.496,33.686 28.083,33.686 31.004,36.607 v1(31.781,36.607) ; U7.A8 v1(53.198,34.945)
  Bottom Layer w0.25: v1(31.781,36.607) 49.758,36.607 51.42,34.945 v1(53.198,34.945)
GND: C2.2 C3.1 C4.1 C5.2 C6.1 C7.2 C8.1 C9.1 C10.1 C11.2 C12.1 C13.2 C14.1 C15.1 C16.2 C17.1 C18.1 C19.1 C20.1 C21.1 C22.2 C23.1 C24.2 C25.1 D1.3 D3.1 J2.2 J2.3 J2.4 J2.5 J3.2 J3.MH pad.1@13.8,8.8 pad.1@13.8,40 pad.1@64,40 R2.1 R10.2 R12.1 S1.1 S1.MH U1.1 U2.2 U3.3 U4.4 U5.10 U5.12 U5.13 U5.24 U6.2 U7.A3 U7.C1 U7.C3 U7.C4 U7.C7 U7.D7 U7.GND U8.2
  other v1: 13.706,2.281 18.706,2.281 23.706,2.281 28.706,2.281 38.706,2.281 43.706,2.281 53.706,2.281 58.706,2.281 63.706,2.281 44.012,4.311 32.006,6.106 11.206,7.281 16.206,7.281 31.206,7.281 51.206,7.281 56.206,7.281 66.206,7.281 40.178,8.773 42.593,8.858 33.606,9.514 56.176,9.927 2.035,11.195 45.158,11.371 33.706,12.281 58.706,12.281 8.572,13.267 48.165,13.528 34.525,14.166 30.505,14.271 2.062,16.785 56.206,17.287 47.428,17.976 31.924,19.553 36.312,19.553 2.035,22.239 8.706,22.281 13.706,22.281 18.706,22.281 23.706,22.281 28.706,22.281 38.706,22.281 43.706,22.281 48.706,22.281 61.257,22.386 10.6,26.7 21.206,27.281 26.206,27.281 61.206,27.281 66.206,27.281 71.206,27.281 76.206,27.281 2.007,27.72 44.844,29.068 33.683,29.111 17.676,30.35 22.23,31.412 45.903,31.418 1.912,31.867 3.706,32.281 8.706,32.281 33.706,32.281 43.706,32.281 63.706,32.281 68.706,32.281 73.706,32.281 41.634,33.702 18.162,34.418 22.867,34.57 29.303,36.088 6.206,37.281 11.206,37.281 16.206,37.281 26.206,37.281 61.206,37.281 66.206,37.281 71.206,37.281 76.206,37.281 40.873,39.129 53.529,39.552 47.883,40.005 45.292,40.603 41.537,41.467 8.706,42.281 18.706,42.281 23.706,42.281 28.706,42.281 33.706,42.281 48.706,42.281 58.706,42.281 68.706,42.281
NetBOOT0_1: BOOT0.1 U7.TP11 | length 2.3
  Top Layer w0.2: BOOT0.1 50.454,24.218 50.454,26.538 U7.TP11
NetC1_1: C1.1 L1.1 U2.6 | length 5.5
  Top Layer w0.6: U2.6 17.804,13.151 18.155,12.799 ; 18.16,12.799 18.16,8.883 L1.1
NetC1_2: C1.2 U2.1 | length 1.5
  Top Layer w0.6: C1.2 U2.1@19.491,13.151
NetC2_1: C2.1 C3.2 FB1.1 U1.2 | length 16.6
  Top Layer w0.8: U1.2@23.353,8.015 29.153,8.015 U1.2@29.165,8.027 ; FB1.1 27.054,12.352 29.158,12.352 C2.1 C2.1@29.165,12.322 ; U1.2@29.165,8.027 C3.2 ; U1.2@29.165,8.027 C3.2 ; C3.2 C2.1@29.165,12.322 ; C3.2 C2.1@29.165,12.322
NetC15_2: C15.2 R8.1 R9.2 U5.9 | length 6.5
  Top Layer w0.254: v1(63.667,19.956) U5.9 68.969,19.956 R8.1
  Bottom Layer w0.254: C15.2 62.558,19.956 v1(63.667,19.956)
NetC16_1: C16.1 L2.1 Q1.3 | length 8.8
  Top Layer w0.254: L2.1 70.58,18.147 71.827,16.9 71.827,15.225 71.298,14.696 Q1.3 71.298,12.417 C16.1
NetD1_2: D1.2 J1.2 | length 7.8
  Top Layer w0.8: J1.2@8.24,16.002 13.066,16.002 14.336,17.272 D1.2
NetD1_4: D1.4 J1.1 | length 16.5
  Top Layer w0.8: J1.1@8.29,10.877 5.872,10.877 4.43,12.319 4.43,16.002 6.845,18.417 D1.4
NetD2_2: D2.2 R3.1 | length 12.4
  Top Layer w0.245: D2.2 11.8,31.985 12.2,32.385 17.459,32.385 20.239,29.605 R3.1
NetD2_3: D2.3 R5.1 | length 10.3
  Top Layer w0.25: D2.3 13.2,35.1 14.422,36.322 R5.1
NetD2_4: D2.4 R4.1 | length 11.3
  Top Layer w0.245: D2.4 11.8,33.067 12.014,32.853 R4.1
NetD3_2: D3.2 J2.1 L2.2 U5.11 | length 10.6
  Top Layer w0.8: U5.11 68.9,22.156 70.58,22.156 75.544,22.156 J2.1@75.7,22
NetD_SEL_1: D_SEL.1 U5.2 | length 5.1
  Top Layer w0.254: v1(63.612,10.356) U5.2
  Bottom Layer w0.254: D_SEL.1 60.128,10.328 63.584,10.328 v1(63.612,10.356)
NetDM1_1: DM1.1 U5.5 | length 2.9
  Top Layer w0.245: v1(63.612,13.589) 65.069,13.589 U5.5
  Bottom Layer w0.245: DM1.1 v1(63.612,13.589)
NetDP1_1: DP1.1 U5.6 | length 5.1
  Top Layer w0.254: v1(63.612,14.732) 65.112,14.732 U5.6
  Bottom Layer w0.254: DP1.1 v1(63.612,14.732)
NetEXTINT1_1: EXTINT1.1 U5.4 | length 5.1
  Top Layer w0.254: v1(63.612,12.573) 65.119,12.573 U5.4
  Bottom Layer w0.254: EXTINT1.1 60.085,12.544 63.583,12.544 v1(63.612,12.573)
NetFB2_2: FB2.2 U5.20 | length 2.5
  Top Layer w0.2: FB2.2 51.269,14.152 51.469,13.952 53.155,13.952 U5.20
NetFB3_2: FB3.2 U5.21 | length 2.3
  Top Layer w0.245: FB3.2 51.403,12.826 53.182,12.826 U5.21
NetNTRST_1: NTRST.1 U7.TP5 | length 2.8
  Top Layer w0.254: v1(49.134,34.163) 49.135,34.162 U7.TP5 U7.TP5
  Bottom Layer w0.254: NTRST.1 47.731,34.145 49.116,34.145 v1(49.134,34.163)
NetQ1_1: Q1.1 R9.1 | length 5.9
  Top Layer w0.254: R9.1 67.492,18.238 67.815,17.915 67.815,15.137 68.986,13.967 Q1.1
NetQ1_2: Q1.2 Q1.4 R8.2 | length 6
  Top Layer w0.254: R8.2 69.843,18.232 71.298,16.777 71.298,15.367 70.648,14.717 Q1.2
NetQ1_5: Q1.5 Q1.6 R10.1 | length 2
  Top Layer w0.2: R10.1 70.613,16.132 Q1.5
NetR1_1: R1.1 R2.2 U2.3 | length 3.2
  Top Layer w0.6: U2.3 20.964,15.051 R2.2 21.014,15.045 21.014,13.566 R1.1
NetR3_2: R3.2 U4.7 | length 4.6
  Top Layer w0.245: R3.2 25.828,29.605 26.651,30.427 U4.7
NetR4_2: R4.2 U4.5 | length 3
  Top Layer w0.245: R4.2 25.31,32.853 25.651,32.512
  Top Layer w0.3: U4.5 25.651,32.512
NetR5_2: R5.2 U4.2 | length 4.1
  Top Layer w0.25: R5.2 26.02,36.322 26.651,35.691 U4.2
NetR11_2: R11.2 R12.2 U7.A13 | length 3.1
  Top Layer w0.245: U7.A13 53.485,40.945 R11.2 53.524,42.456 R12.2
NetSBOOT1_1: SBOOT1.1 U5.1 | length 2.9
  Top Layer w0.254: v1(63.612,9.271) 65.121,9.271 U5.1
  Bottom Layer w0.254: SBOOT1.1 v1(63.612,9.271)
NetSWCLK_1: SWCLK.1 U7.TP9 | length 2.8
  Top Layer w0.25: v1(49.261,29.083) 49.262,29.082 U7.TP9 U7.TP9
  Bottom Layer w0.25: SWCLK.1 47.735,29.105 49.239,29.105 v1(49.261,29.083)
NetSWDIO_1: SWDIO.1 U7.TP7 | length 2.8
  Top Layer w0.25: v1(49.134,31.623) 49.135,31.622 U7.TP7 U7.TP7
  Bottom Layer w0.25: SWDIO.1 47.719,31.617 49.127,31.617 v1(49.134,31.623)
NetTP8_1: TP8.1 U7.TP8 | length 2.7
  Top Layer w0.25: U7.TP8 U7.TP8 40.243,31.622 v1(40.244,31.623)
  Bottom Layer w0.25: v1(40.244,31.623) 40.262,31.605 41.726,31.605 TP8.1
NetTP10_1: TP10.1 U7.TP10 | length 2.7
  Top Layer w0.254: U7.TP10 U7.TP10 v1(39.965,29.082)
  Bottom Layer w0.254: v1(39.965,29.082) 41.709,29.082 41.726,29.065 TP10.1
NetTPULSE1_1: TPULSE1.1 U5.3 | length 2.9
  Top Layer w0.245: v1(63.612,11.43) 65.11,11.43 U5.3
  Bottom Layer w0.245: TPULSE1.1 v1(63.612,11.43)
NetU5_7: U5.7 VUSB1.1 | length 2.9
  Top Layer w0.254: v1(63.667,15.857) 65.135,15.857 U5.7
  Bottom Layer w0.254: VUSB1.1 62.25,15.841 63.651,15.841 v1(63.667,15.857)
RESET_N: C17.2 S1.2 U5.8 U7.A1 | length 66.4
  Top Layer w0.25: S1.2@4.873,22.137 4.873,23.376 6.274,24.776 7.366,24.776 v1(11.461,24.776) ; U7.A1 51.965,26.485 51.913,26.433 v1(51.913,24.748) 56.048,24.748 61.944,18.852 U5.8@65.12,18.852
  Bottom Layer w0.25: v1(11.461,24.776) 51.885,24.776 v1(51.913,24.748)
RLED: U4.6 U7.A7 | length 30.9
  Top Layer w0.25: U4.6 26.151,32.516 26.39,32.755 28.803,32.755 31.255,35.208 v1(34.565,35.208) ; U7.A7 v1(53.198,33.745)
  Bottom Layer w0.25: v1(34.565,35.208) 49.957,35.208 51.42,33.745 v1(53.198,33.745)
RX-BT: J3.3 R6.1 R11.1 RX-BT.1 U8.1 | length 66.1
  Top Layer w0.2: U8.1 37.77,12.907 34.988,10.125 34.988,7.224 36.981,5.231 42.782,5.231 J3.3@44.467,6.915 ; R11.1 56.13,40.984 58.278,38.836 v1(58.278,25.908)
  Bottom Layer w0.2: J3.3@44.467,6.915 47.307,9.756 47.307,14.846 50.876,18.415 R6.1 58.251,18.642 58.251,25.881 v1(58.278,25.908) RX-BT.1
RX-NEO: FB3.1 R7.2 RX-NEO.1 U6.4 | length 26.7
  Top Layer w0.2: U6.4 44.643,16.256 v1(45.451,16.256) ; v1(46.092,12.748) 49.434,12.748 FB3.1 49.388,12.611 v1(49.388,11.557)
  Bottom Layer w0.2: v1(45.451,16.256) 46.092,15.614 v1(46.092,12.748) ; v1(49.388,11.557) 50.785,11.557 53.869,14.641 57.414,14.641 RX-NEO.1 57.427,14.643 58.24,14.643 60.474,16.876 60.474,19.039 60.429,19.084 60.429,19.312 59.675,20.066 R7.2
RX-NEO-DBG: J3.4 U8.3 | length 9.5
  Top Layer w0.2: J3.4@37.667,6.915 36.249,8.333 36.249,10.187 37.29,11.228 38.492,11.228 39.67,12.405 U8.3
SEL: J3.1 R13.1 U6.6 U8.6 | length 18.3
  Top Layer w0.2: R13.1 35.401,16.256 v1(36.688,16.256) 37.75,16.256 U8.6 ; v1(41.26,16.256) 42.703,16.256 U6.6
  Bottom Layer w0.2: v1(36.688,16.256) v1(41.26,16.256) 41.26,8.022 J3.1@42.367,6.915
TX-BT: J3.5 R7.1 TX-BT.1 U6.1 U7.A11 | length 50.3
  Top Layer w0.2: U6.1 42.723,11.159 J3.5@44.467,9.415 ; U7.A11 55.505,38.545 57.262,36.788 v1(57.262,25.908)
  Bottom Layer w0.2: J3.5@44.467,9.415 46.309,9.415 46.907,10.013 46.907,15.049 50.69,18.832 56.79,18.832 57.301,19.343 R7.1 57.389,20.154 57.262,20.281 v1(57.262,25.908) TX-BT.1
TX-NEO: FB2.1 R6.2 TX-NEO.1 U8.4 | length 23.8
  Top Layer w0.2: U8.4 39.69,16.256 40.273,16.256 41.416,15.113 45.275,15.113 46.099,14.289 FB2.1 49.515,14.334 v1(49.515,15.494)
  Bottom Layer w0.2: v1(49.515,15.494) 50.658,16.637 TX-NEO.1 58.913,16.637 59.724,17.448 R6.2
TX-NEO-DBG: J3.6 U6.3 | length 11
  Top Layer w0.2: J3.6 39.32,9.6 41.26,11.54 41.26,13.918 42.054,14.713 44.454,14.713 44.623,14.544 U6.3
pads on no net: FID1.F1 FID2.F1 FID3.F1 U5.14 U5.15 U5.16 U5.17 U5.18 U5.19 U7.A5 U7.A6 U7.A10 U7.A12 U7.A14 U7.A15 U7.A16 U7.A17 U7.A18 U7.B1 U7.B2 U7.B3 U7.B4 U7.B5 U7.B6 U7.B7 U7.B8 U7.C2 U7.C5 U7.C6 U7.C8 U7.C9 U7.C10 U7.C11 U7.C12 U7.C13 U7.C14 U7.C15 U7.C16 U7.C17 U7.C18 U7.D1 U7.D2 U7.D3 U7.D4 U7.D5 U7.D6 U7.D8 U7.TP1 U7.TP2 U7.TP3 U7.TP4 U7.TP6 U7.TP12

## Polygon pours and split planes (outlines as drawn)
GND on Bottom Layer "GND_L02_P013" (solid, remove dead copper, pour order 13): 2.338,8.366 ccw(c2.343,8.43) 2.344,8.366 cw(c2.398,2.461) 2.398,8.366 cw(c2.398,2.461) 8.303,2.515 ccw(c8.367,2.516) 8.303,2.51 8.303,0 ccw(c8.367,0) 8.367,-0.064 69.253,-0.064 ccw(c69.253,0) 69.315,-0.016 ccw(c69.26,0.016) 69.324,0.016 ccw(c69.26,0.016) 69.306,0.061 69.306,2.822 ccw(c69.244,2.839) 69.308,2.837 cw(c75.578,2.667) 75.547,8.939 ccw(c75.578,8.995) 75.578,8.931 79.986,8.931 ccw(c79.986,8.995) 80.05,8.995 80.05,39.967 ccw(c80,40.007) 80.064,40.007 ccw(c80,40.007) 80.043,40.054 ccw(c79.986,40.025) 79.941,40.071 75.592,40.071 ccw(c75.671,46.393) 75.593,40.071 75.592,40.071 cw(c75.671,46.393) 69.348,46.472 ccw(c69.284,46.472) 69.348,46.472 ccw(c69.284,46.472) 69.348,46.474 69.279,49.024 cw(c69.215,49.022) 69.279,49.022 69.279,49.024 ccw(c69.215,49.022) 69.215,49.086 8.531,49.086 ccw(c8.531,49.022) 8.467,49.022 8.467,46.472 ccw(c8.531,46.472) 8.473,46.445 ccw(c8.531,46.418) 8.467,46.419 cw(c2.652,46.472) 2.599,40.656 ccw(c2.598,40.593) 2.574,40.652 ccw(c2.551,40.592) 2.551,40.656 0,40.656 ccw(c0,40.592) -0.064,40.592 -0.064,8.43 ccw(c0,8.43) 0,8.366
GND on Top Layer "GND_L01_P016" (solid, remove dead copper, pour order 16): 0,8.366 2.338,8.366 ccw(c2.343,8.43) 2.344,8.366 cw(c2.398,2.461) 8.303,2.515 ccw(c8.367,2.516) 8.303,2.51 8.303,0.1 ccw(c8.367,0.1) 8.367,0.036 69.367,0.036 ccw(c69.367,0.1) 69.431,0.1 69.431,2.999 cw(c75.47,2.892) 75.577,8.931 ccw(c75.578,8.995) 75.578,8.931 79.986,8.931 ccw(c79.986,8.995) 80.05,8.995 80.05,39.967 ccw(c80,40.007) 80.064,40.007 ccw(c80,40.007) 80,40.071 75.593,40.071 ccw(c75.821,46.243) 75.594,40.071 75.593,40.071 cw(c75.821,46.243) 69.648,46.47 ccw(c69.584,46.472) 69.648,46.472 ccw(c69.584,46.472) 69.648,46.474 69.595,49.023 cw(c69.531,49.022) 69.595,49.022 69.595,49.023 ccw(c69.531,49.022) 69.531,49.086 8.531,49.086 ccw(c8.531,49.022) 8.467,49.022 8.467,46.472 ccw(c8.531,46.472) 8.467,46.472 cw(c2.52,46.441) 8.468,46.441 cw(c2.52,46.441) 2.551,40.493 cw(c2.52,46.441) 2.551,40.493 0.012,40.493 ccw(c0,40.43) -0.064,40.43 -0.064,8.43 ccw(c0,8.43)

## Keep-outs
Keep-Out Layer:
  lines w0.127: 2.343,8.43 cw(c2.398,2.461) 8.367,2.516 ; 2.551,8.43 0,8.43 0,36.1 0,40.43 2.551,40.429 ccw(c2.52,46.441) 8.531,46.472 8.531,49.022 69.531,49.022 69.584,46.472 ccw(c75.821,46.243) 75.592,40.007 80,40.007 ; 8.367,2.551 8.367,0.1 69.367,0.1 69.367,3 cw(c75.47,2.892) 75.578,8.995 79.986,8.995 79.986,39.995

## Silkscreen, mask and mechanical layers (free items; w line width, h text height)
Top Overlay:
  lines w0.127: 0.8,29.924 17.676,29.924 17.676,35.51 0.8,35.51
Bottom Overlay:
  lines w0.127: 32.243,13.906 50.785,13.906 ; 39.99,11.557 39.99,13.843 ; 40.002,13.895 40.002,16.244 ; 43.165,11.557 43.165,13.843 ; 46.083,13.878 46.083,16.228 ; 46.086,11.557 46.086,13.843 ; 2.662,9.399 5.21,9.399 5.21,16.996 2.662,16.996 2.662,9.399 ; 32.243,11.557 50.785,11.557 50.785,16.256 32.243,16.256 32.243,11.557
  text "GND 24VDC" at 4.176,16.51 h0.76 r90
  text "TX-BT         TXNEO-DBG" at 50.15,14.732 h0.76
  text "RX-BT SEL GND RXNEO-DBG" at 50.15,12.319 h0.76

## Text inside footprints (layer, text, board x,y; h text height)
D1: Top Overlay "+" at 12.049,14.524 h0.76 r90; Top Overlay "-" at 14.843,14.524 h0.76 r90; Top Overlay "~" at 12.355,15.933 h0.76 r90; Top Overlay "~" at 15.175,15.933 h0.76 r90
D2: Top Overlay "+" at 12.875,29.45 h0.76 r270